# Altium PCB CLLC_SecondarSide_v1.PcbDoc
Units mm, origin at the board's own origin, x right, y up, seen from the top; angles counter-clockwise.
Board outline 131 x 138 mm, 2 copper layers (Top Layer, Bottom Layer); 17 components, 8 nets, 42 pads, 343 vias.
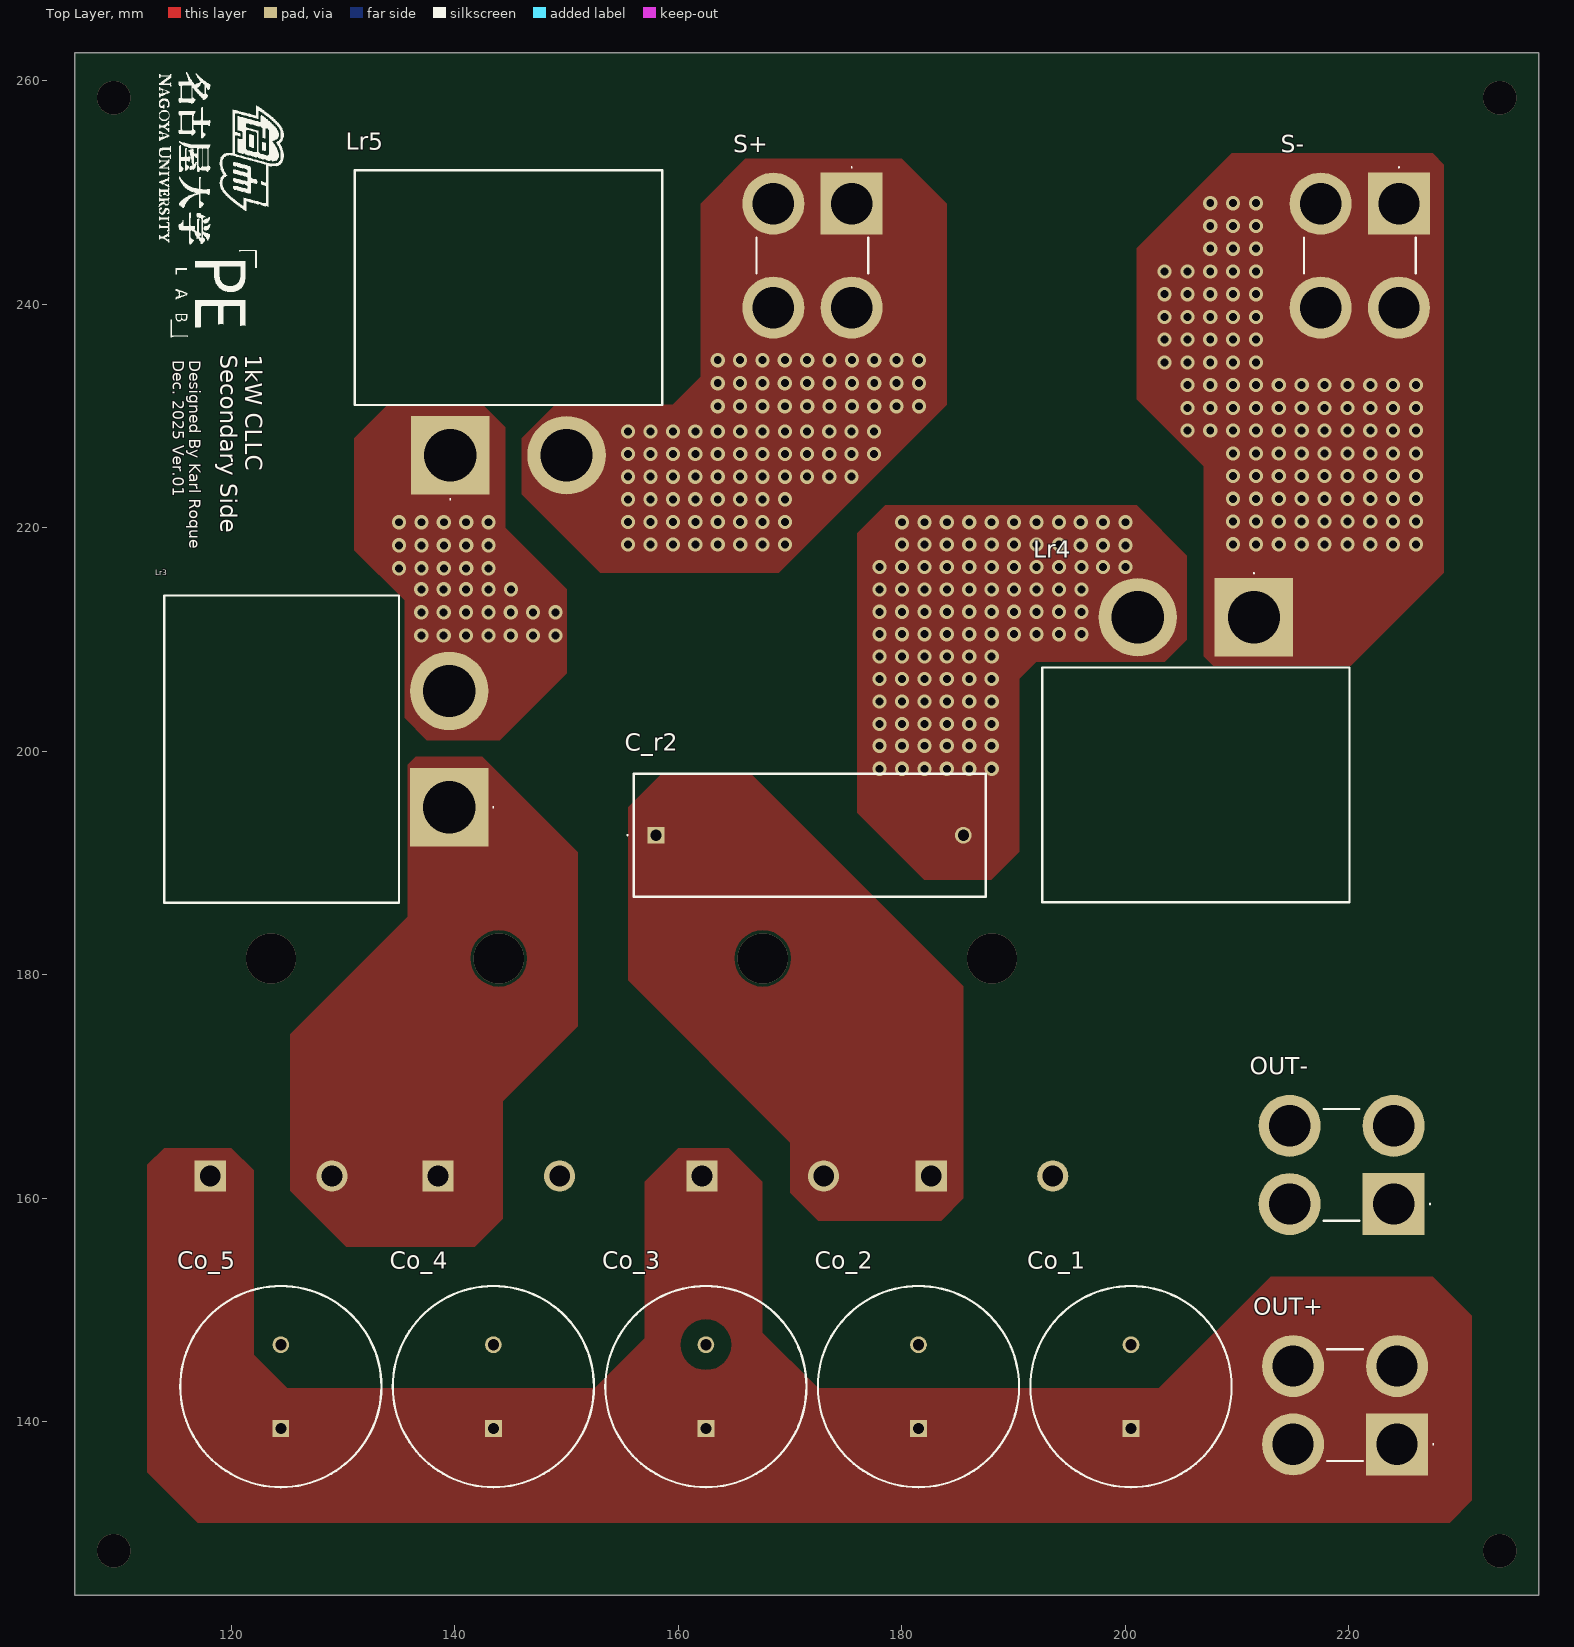
[diagram p0: Top Layer view]
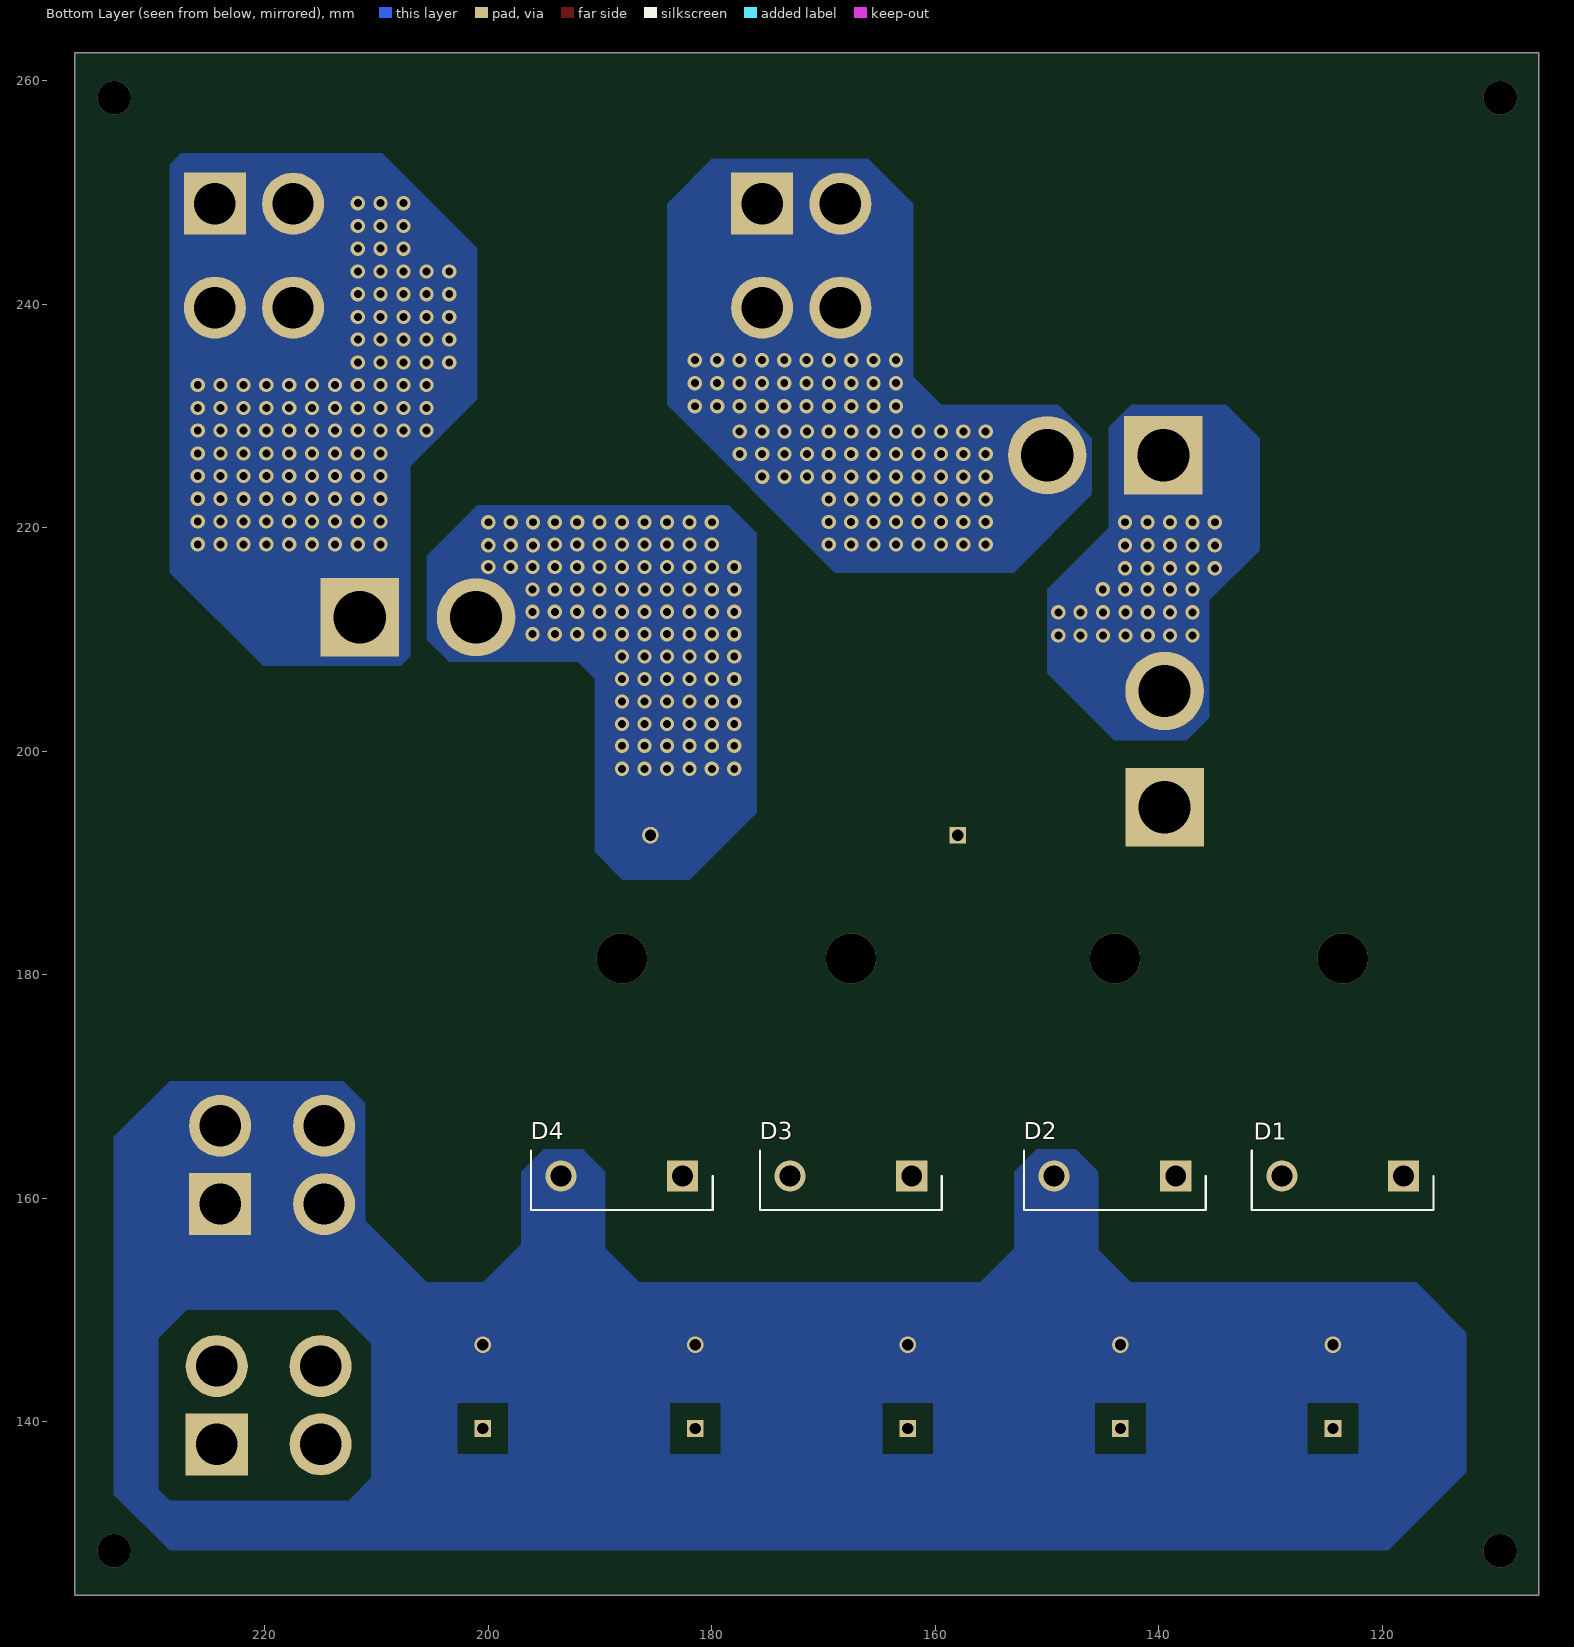
[diagram p1: Bottom Layer view, seen from below]
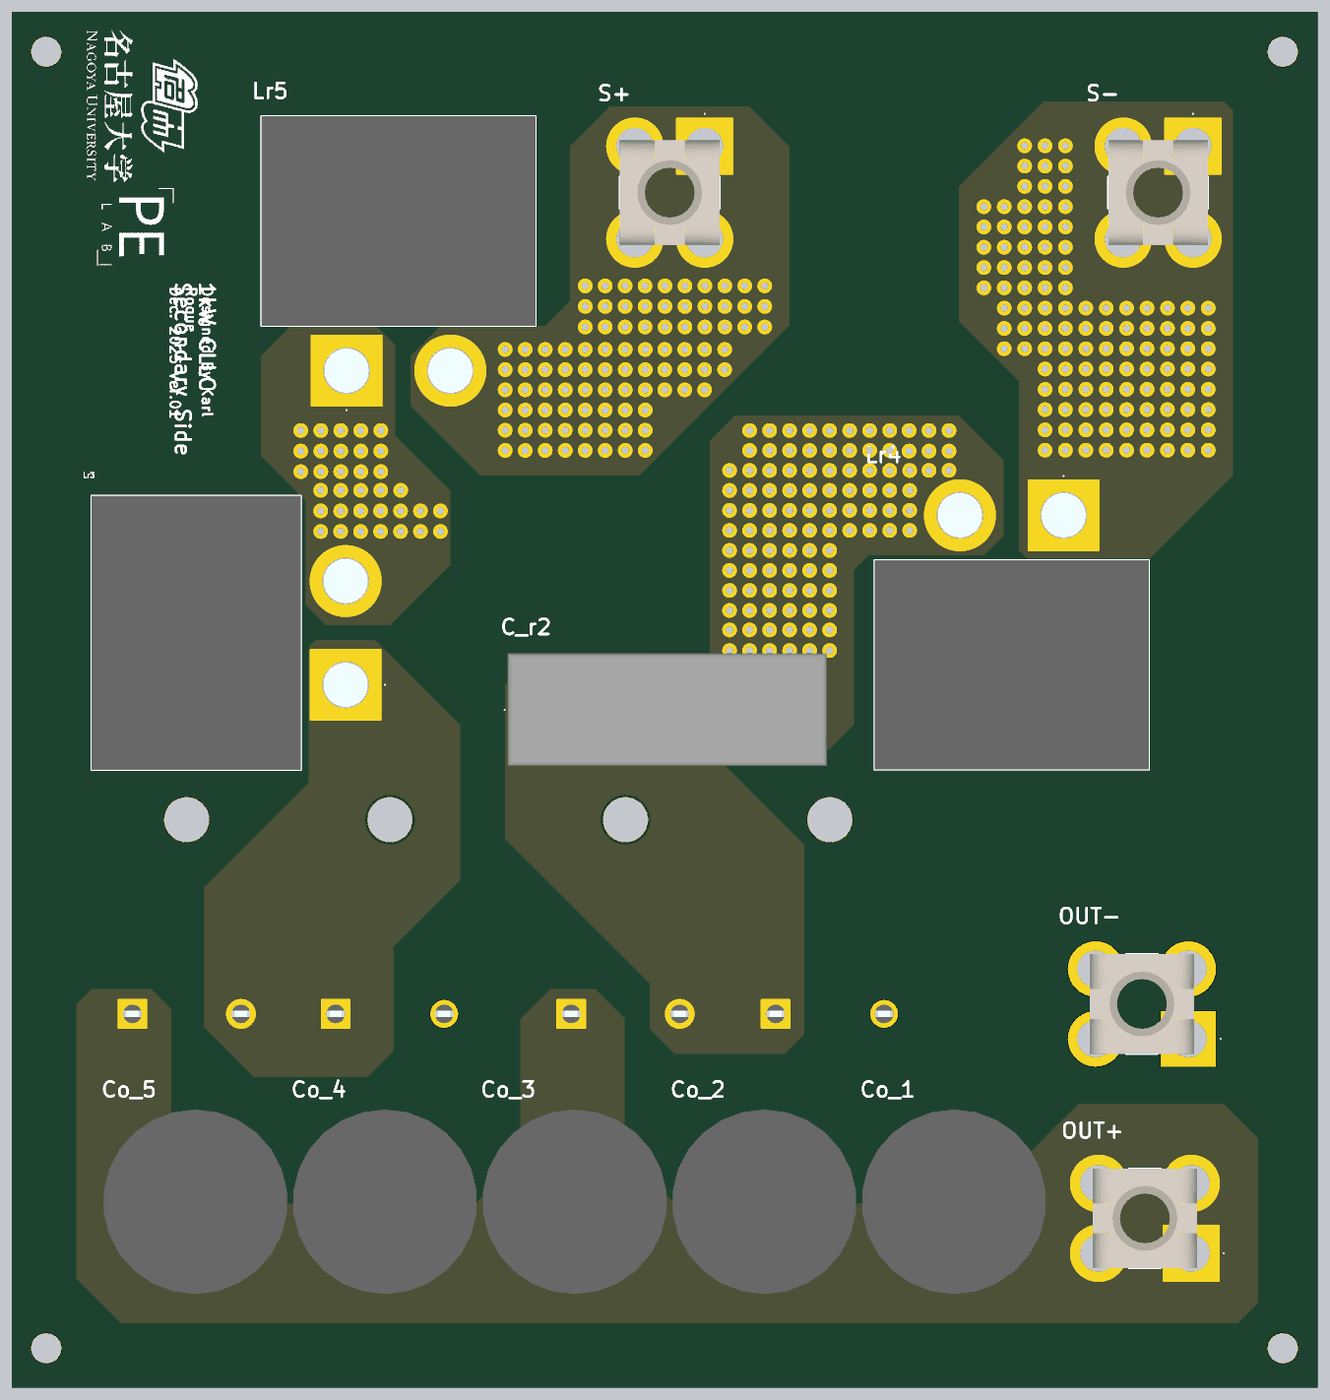
[diagram p2: 3D render of the assembled board from above, using the file's embedded part models]
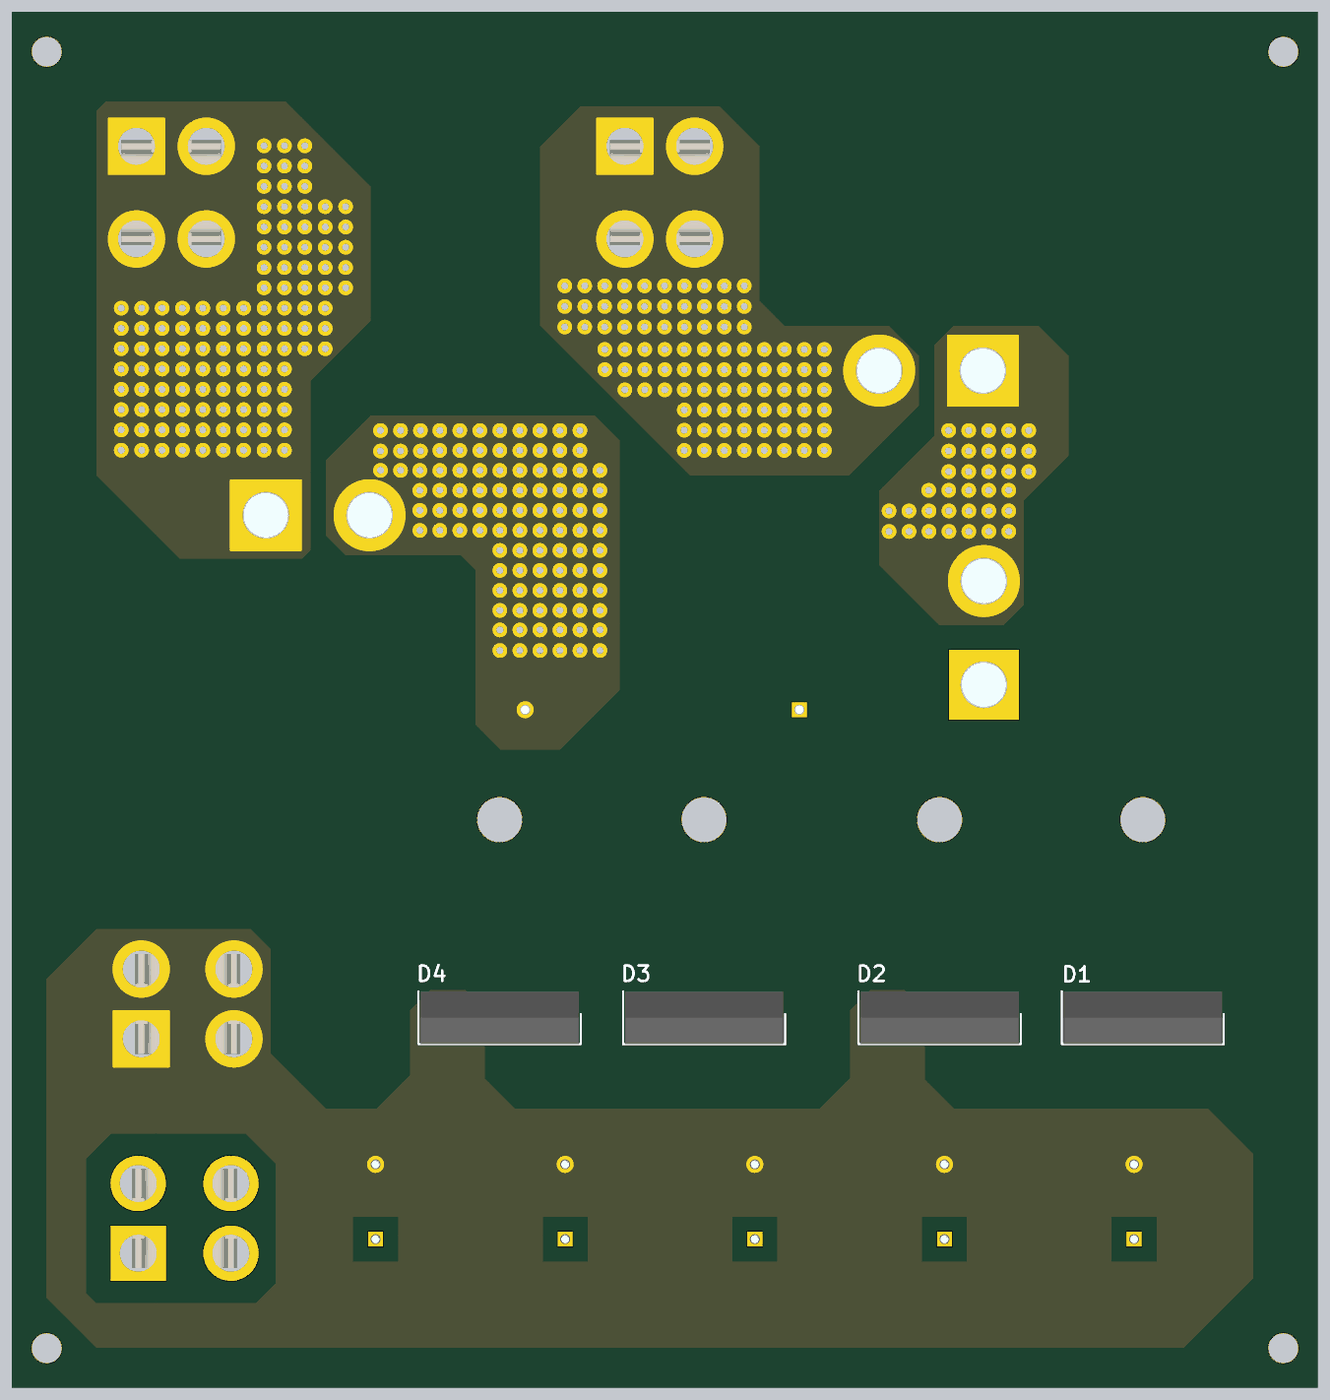
[diagram p3: 3D render of the assembled board from below, using the file's embedded part models]

## Layer stack, top to bottom
Top Solder: solder mask 0.0102, Solder Resist, Dk 3.5
Top Layer: signal copper 0.0356
Dielectric 1: dielectric 0.32, FR-4, Dk 4.8
Bottom Layer: signal copper 0.0356
Bottom Solder: solder mask 0.0102, Solder Resist, Dk 3.5

## Board outline
106,124.5 237,124.5 237,262.5 106,262.5

## Design rules (kind name [scope] priority, off if disabled: settings)
Clearance [InNet('GND') vs InNet('NetCo_1_1')] p1: gap=1.5 ignorepadtopadclearanceinfootprint=FALSE
Clearance Clearance_1 [All] p2: gap=0.254 ignorepadtopadclearanceinfootprint=FALSE
PolygonConnect PolygonConnect_4 [All vs IsNamedPolygon('NETC_R2_2_L01_P059') Or IsNamedPolygon('NETLR4_S1_L01_P060') Or IsNamedPolygon('NETLR5_F1_L01_P061') Or IsNamedPolygon('Top Layer-NetCo_1_1') Or IsNamedPolygon('Top Layer-NetC_r2_1') Or IsNamedPolygon('Top Layer-NetD1_2') Or IsNamedPolygon('Top Layer-NetD1_2 1') Or IsNamedPolygon('Top Layer-NetLr3_F1') Or IsNamedPolygon('Bottom Layer-GND') Or IsNamedPolygon('Bottom Layer-NetLr3_F1') Or IsNamedPolygon('NETC_R2_2_L02_P045') Or IsNamedPolygon('NETLR4_S1_L02_P057') Or IsNamedPolygon('NETLR5_F1_L02_P055')] p1: connectstyle=Direct reliefconductorwidth=0.254 reliefentries=4 polygonreliefangle="90 Angle" airgapwidth=0.254
PolygonConnect PolygonConnect_3 [All vs IsNamedPolygon('NETC_R2_1_L01_P015') Or IsNamedPolygon('NETC_R2_2_L01_P016') Or IsNamedPolygon('NETD1_2_L01_P011') Or IsNamedPolygon('NETLR3_F1_L01_P014') Or IsNamedPolygon('ETLR4_S1_L01_P018') Or IsNamedPolygon('NONET_L01_P023') Or IsNamedPolygon('Top Layer-NetCo_1_1') Or IsNamedPolygon('Bottom Layer-GND') Or IsNamedPolygon('NETC_R2_1_L02_P012') Or IsNamedPolygon('NETC_R2_2_L02_P033') Or IsNamedPolygon('NETD1_2_L02_P003') Or IsNamedPolygon('NETLR3_F1_L02_P004') Or IsNamedPolygon('NETLR4_S1_L02_P005')] p2: connectstyle=Direct reliefconductorwidth=0.254 reliefentries=4 polygonreliefangle="90 Angle" airgapwidth=0.254
PolygonConnect PolygonConnect_2 [All vs IsNamedPolygon('NETC_R2_1_L01_P015') Or IsNamedPolygon('NETC_R2_2_L01_P006') Or IsNamedPolygon('NETC_R2_2_L01_P019') Or IsNamedPolygon('NETD1_2_L01_P011') Or IsNamedPolygon('NETLR3_F1_L01_P014') Or IsNamedPolygon('ETLR4_S1_L01_P018') Or IsNamedPolygon('NONET_L01_P023') Or IsNamedPolygon('Top Layer-NetCo_1_1') Or IsNamedPolygon('Bottom Layer-GND') Or IsNamedPolygon('NETC_R2_1_L02_P012') Or IsNamedPolygon('NETC_R2_2_L01_P016') Or IsNamedPolygon('NETD1_2_L02_P003') Or IsNamedPolygon('NETLR3_F1_L02_P004') Or IsNamedPolygon('NETLR4_S1_L02_P005')] p3: connectstyle=Direct reliefconductorwidth=0.254 reliefentries=4 polygonreliefangle="90 Angle" airgapwidth=0.254
PolygonConnect PolygonConnect_1 [All vs IsNamedPolygon('NETC_R2_1_L01_P015') Or IsNamedPolygon('NETC_R2_2_L01_P006') Or IsNamedPolygon('NETC_R2_2_L01_P019') Or IsNamedPolygon('NETD1_2_L01_P011') Or IsNamedPolygon('NETLR3_F1_L01_P014') Or IsNamedPolygon('ETLR4_S1_L01_P018') Or IsNamedPolygon('Top Layer-NetCo_1_1') Or IsNamedPolygon('GND_L02_P008') Or IsNamedPolygon('NETC_R2_1_L02_P012') Or IsNamedPolygon('NETC_R2_2_L01_P016') Or IsNamedPolygon('NETD1_2_L02_P003') Or IsNamedPolygon('NETLR3_F1_L02_P004') Or IsNamedPolygon('NETLR4_S1_L02_P005')] p4: connectstyle=Direct reliefconductorwidth=0.254 reliefentries=4 polygonreliefangle="90 Angle" airgapwidth=0.254
PolygonConnect [All] p5: connectstyle=Relief reliefconductorwidth=0.254 reliefentries=4 polygonreliefangle="90 Angle" airgapwidth=0.254
RoutingVias [All] p1: holewidth=0.711 width=1.27 viastyle="Through Hole" minholewidth=0.711 minwidth=1.27 maxholewidth=0.711 maxwidth=1.27
SolderMaskExpansion [All] p1: expansion=0.102 istentingtop=FALSE
SupplyNets "Schematic Supply Nets" [InNet('GND')] p1: voltage=0.000
Width [All] p1: maxlimit=0.254 minlimit=0.254 preferedwidth=0.254
30 further rules are at their usual default settings.

## Components (designator, comment, footprint, x,y, rotation, side; value= is the part's Value field where it differs from the comment)
C_r2 "C4AQQBU4140M1WJ" C4AQQBU4140M1WJ 158,192.5 r0 top
Co_1 "UCP2G221MHD" CAPPRD750W80D1800H4800 200.5,139.412 r90 top
Co_2 "UCP2G221MHD" CAPPRD750W80D1800H4800 181.484,139.412 r90 top
Co_3 "UCP2G221MHD" CAPPRD750W80D1800H4800 162.468,139.412 r90 top
Co_4 "UCP2G221MHD" CAPPRD750W80D1800H4800 143.452,139.412 r90 top
Co_5 "UCP2G221MHD" CAPPRD750W80D1800H4800 124.436,139.412 r90 top
D1 "STTH3012WL" TO1088P531X1588X2596-2P 118.12,162 r0 bottom
D2 "STTH3012WL" TO1088P531X1588X2596-2P 138.5,162 r0 bottom
D3 "STTH3012WL" TO1088P531X1588X2596-2P 162.12,162 r0 bottom
D4 "STTH3012WL" TO1088P531X1588X2596-2P 182.62,162 r0 bottom
Lr3 "ER26A2DC-6R8K" ER26A2DC6R8K 139.5,195 r90 top
Lr4 "ER26A2DC-6R8K" ER26A2DC6R8K 211.5,212 r180 top
Lr5 "ER26A2DC-6R8K" ER26A2DC6R8K 139.6,226.5 r0 top
OUT+ "AMT0450028DB0000G" AMT0450028DB0000G 224.3,138 r90 top
OUT- "AMT0450028DB0000G" AMT0450028DB0000G 224,159.5 r90 top
S+ "AMT0450028DB0000G" AMT0450028DB0000G 175.5,249 r180 top
S- "AMT0450028DB0000G" AMT0450028DB0000G 224.473,249 r180 top

## Footprints (in the part's own frame and the unit in brackets; to place one, negate y for a bottom-side part, rotate by r counter-clockwise, add the part's x,y. Pads: shape width x height; smd on the part's side, far side on the other; paste and mask are expansions set on the pad)
AMT0450028DB0000G [mm]
  rect 5.55x5.55 hole 3.7: 1(0,0)
  round 5.55 hole 3.7: 2(0,9.3) 3(7,0) 4(7,9.3)
  silkscreen extent -1.5,-3.3 8.5,6.25, body extent -1.5,-0.6 8.5,9.9, height 7.59
C4AQQBU4140M1WJ [mm]
  rect 1.5x1.5 hole 1: 1(0,0)
  round 1.5 hole 1: 2(27.5,0)
  silkscreen extent -2.6,-5.5 29.5,5.5, body extent -2.25,-5.66 29.75,5.65, height 20.16
CAPPRD750W80D1800H4800 [mm]
  rect 1.5x1.5 hole 1: 1(0,0)
  round 1.5 hole 1: 2(7.5,0)
  silkscreen extent -5.25,-9 12.75,9, body extent -5.5,-9.25 13,9.25, height 48
ER26A2DC6R8K [mm]
  round 7.02 hole 4.68: F1(10.4,0)
  rect 7.02x7.02 hole 4.68: S1(0,0)
  silkscreen extent -8.55,-4 18.95,25.5, body extent -8.55,-2.23 18.95,25.5, height 17.1
TO1088P531X1588X2596-2P [mm]
  rect 2.79x2.79 hole 1.86: 1(0,0)
  round 2.79 hole 1.86: 2(10.88,0)
  silkscreen extent -2.69,-2.27 13.57,3.04, body extent -2.5,-2.27 13.38,3.04, height 25.96

## Part data
C_r2: "Capacitor", Manufacturer_Name=KEMET, Mouser Part Number=80-C4AQQBU4140M1WJ, Datasheet Link=https://search.kemet.com/component-documentation/download/specsheet/C4AQQBU4140M1WJ, Height=20.2mm, Manufacturer_Part_Number=C4AQQBU4140M1WJ, Mouser Price/Stock=https://www.mouser.co.uk/ProductDetail/KEMET/C4AQQBU4140M1WJ?qs=81r%252BiQLm7BSMlBltxrghzA%3D%3D
Co_1 Co_2 Co_3 Co_4 Co_5: "Capacitor", Manufacturer_Name=Nichicon, Mouser Part Number=647-UCP2G221MHD, Datasheet Link=https://componentsearchengine.com/Datasheets/1/UCP2G221MHD.pdf, Height=48mm, Manufacturer_Part_Number=UCP2G221MHD, Mouser Price/Stock=https://www.mouser.co.uk/ProductDetail/Nichicon/UCP2G221MHD?qs=iCzJi%2FIZBF51iuUvn3RRMQ%3D%3D
D1 D2 D3 D4: "Diode", Manufacturer_Name=STMicroelectronics, Mouser Part Number=511-STTH3012WL, Arrow Part Number=STTH3012WL, Arrow Price/Stock=https://www.arrow.com/en/products/stth3012wl/stmicroelectronics?region=nac, Datasheet Link=https://www.st.com/resource/en/datasheet/stth3012.pdf, Height=5.31mm, Manufacturer_Part_Number=STTH3012WL, Mouser Price/Stock=https://www.mouser.co.uk/ProductDetail/STMicroelectronics/STTH3012WL?qs=tlsG%2FOw5FFj6CHRXwq6hOA%3D%3D
Lr3 Lr4 Lr5: "Inductor", Manufacturer_Name=Bourns, Datasheet Link=https://www.bourns.com/docs/product-datasheets/er26a.pdf, Height=17mm, Manufacturer_Part_Number=ER26A2DC-6R8K
OUT+ OUT- S+ S-: "Connector", Manufacturer_Name=Amphenol, Mouser Part Number=523-AMT0450028DB000G, Datasheet Link=https://www.anytek.com.cn/Upload/AMT45028DB-821f25108d7e4e0caa268ff3448ada5b.pdf, Height=7.4mm, Manufacturer_Part_Number=AMT0450028DB0000G, Mouser Price/Stock=https://www.mouser.co.uk/ProductDetail/Amphenol-Anytek/AMT0450028DB0000G?qs=ST9lo4GX8V0in%252BhOLfQ9xA%3D%3D

## Via types
v1: diameter 1.27, hole 0.711, Top Layer to Bottom Layer, 335 vias
v2: diameter 4.5, hole 4.5, Top Layer to Bottom Layer, 4 vias
v3: diameter 3, hole 3, Top Layer to Bottom Layer, 4 vias

## Nets (pads, with @x,y where several pads share a name; then routed paths per layer and width w, separated by ;. In a path a pad name is that pad's centre, name@x,y a point inside that pad or via, vN(x,y) a via of type N, cw(c..) or ccw(c..) an arc to the next point about the centre after c; other vN are vias at no path point)
GND: Co_1.2 Co_2.2 Co_3.2 Co_4.2 Co_5.2 D2.2 D4.2 OUT-.1 OUT-.2 OUT-.3 OUT-.4
NetC_r2_1: C_r2.1 D3.2 D4.1
NetC_r2_2: C_r2.2 Lr4.F1
  other v1: 178,198.438 180.006,198.438 182.013,198.438 184.019,198.438 186.026,198.438 188.032,198.438 178,200.5 180.006,200.5 182.013,200.5 184.019,200.5 186.026,200.5 188.032,200.5 178,202.455 180.007,202.455 182.014,202.455 184.021,202.455 186.028,202.455 188.035,202.455 178,204.461 180.007,204.461 182.014,204.461 184.021,204.461 186.028,204.461 188.035,204.461 178,206.468 180.007,206.468 182.014,206.468 184.021,206.468 186.028,206.468 188.035,206.468 178,208.474 180.007,208.474 182.014,208.474 184.021,208.474 186.028,208.474 188.035,208.474 178,210.481 180.007,210.481 182.014,210.481 184.021,210.481 186.028,210.481 188.035,210.481 190.042,210.481 192.049,210.481 194.056,210.481 196.062,210.481 178,212.487 180.007,212.487 182.014,212.487 184.021,212.487 186.028,212.487 188.035,212.487 190.042,212.487 192.049,212.487 194.056,212.487 196.062,212.487 178,214.49 180.007,214.49 182.014,214.49 184.021,214.49 186.028,214.49 188.035,214.49 190.042,214.49 192.049,214.49 194.056,214.49 196.062,214.49 178,216.494 180.007,216.494 182.014,216.494 184.021,216.494 186.028,216.494 188.035,216.494 190.042,216.494 192.049,216.494 194.056,216.494 196.062,216.494 198,216.5 200.006,216.5 196,218.438 198,218.438 200.006,218.438 180.007,218.497 182.014,218.497 184.021,218.497 186.028,218.497 188.035,218.497 190.042,218.497 192.049,218.497 194.056,218.497 180.007,220.5 182.014,220.5 184.021,220.5 186.028,220.5 188.035,220.5 190.042,220.5 192.049,220.5 194.056,220.5 196,220.5 198,220.5 200.006,220.5
NetCo_1_1: Co_1.1 Co_2.1 Co_3.1 Co_4.1 Co_5.1 D1.1 D3.1 OUT+.1 OUT+.2 OUT+.3 OUT+.4
NetD1_2: D1.2 D2.1 Lr3.S1
NetLr3_F1: Lr3.F1 Lr5.S1
  other v1: 137,210.375 139.001,210.375 141.002,210.375 143.003,210.375 145.004,210.375 147.005,210.375 149.006,210.375 137,212.438 139.001,212.438 141.002,212.438 143.003,212.438 145.004,212.438 147.005,212.438 149.006,212.438 137,214.5 139.006,214.5 141.013,214.5 143.019,214.5 145.026,214.5 135,216.375 137.006,216.375 139.013,216.375 141.019,216.375 143.026,216.375 135,218.438 137.006,218.438 139.013,218.438 141.019,218.438 143.026,218.438 135,220.5 137.006,220.5 139.013,220.5 141.019,220.5 143.026,220.5
NetLr4_S1: Lr4.S1 S-.1 S-.2 S-.3 S-.4
  other v1: 209.636,218.523 211.682,218.523 213.727,218.523 215.773,218.523 217.818,218.523 219.864,218.523 221.909,218.523 223.955,218.523 226,218.523 209.636,220.558 211.682,220.558 213.727,220.558 215.773,220.558 217.818,220.558 219.864,220.558 221.909,220.558 223.955,220.558 226,220.558 209.636,222.592 211.682,222.592 213.727,222.592 215.773,222.592 217.818,222.592 219.864,222.592 221.909,222.592 223.955,222.592 226,222.592 209.636,224.627 211.682,224.627 213.727,224.627 215.773,224.627 217.818,224.627 219.864,224.627 221.909,224.627 223.955,224.627 226,224.627 209.636,226.662 211.682,226.662 213.727,226.662 215.773,226.662 217.818,226.662 219.864,226.662 221.909,226.662 223.955,226.662 226,226.662 205.545,228.697 207.591,228.697 209.636,228.697 211.682,228.697 213.727,228.697 215.773,228.697 217.818,228.697 219.864,228.697 221.909,228.697 223.955,228.697 226,228.697 205.545,230.732 207.591,230.732 209.636,230.732 211.682,230.732 213.727,230.732 215.773,230.732 217.818,230.732 219.864,230.732 221.909,230.732 223.955,230.732 226,230.732 205.545,232.767 207.591,232.767 209.636,232.767 211.682,232.767 213.727,232.767 215.773,232.767 217.818,232.767 219.864,232.767 221.909,232.767 223.955,232.767 226,232.767 203.5,234.802 205.545,234.802 207.591,234.802 209.636,234.802 211.682,234.802 203.5,236.836 205.545,236.836 207.591,236.836 209.636,236.836 211.682,236.836 203.5,238.871 205.545,238.871 207.591,238.871 209.636,238.871 211.682,238.871 203.5,240.906 205.545,240.906 207.591,240.906 209.636,240.906 211.682,240.906 203.5,242.941 205.545,242.941 207.591,242.941 209.636,242.941 211.682,242.941 207.591,244.976 209.636,244.976 211.682,244.976 207.591,247.011 209.636,247.011 211.682,247.011 207.591,249.045 209.636,249.045 211.682,249.045
NetLr5_F1: Lr5.F1 S+.1 S+.2 S+.3 S+.4
  other v1: 155.5,218.5 157.506,218.5 159.513,218.5 161.519,218.5 163.526,218.5 165.532,218.5 167.539,218.5 169.545,218.5 155.5,220.525 157.506,220.525 159.513,220.525 161.519,220.525 163.526,220.525 165.532,220.525 167.539,220.525 169.545,220.525 155.5,222.55 157.506,222.55 159.513,222.55 161.519,222.55 163.526,222.55 165.532,222.55 167.539,222.55 169.545,222.55 155.5,224.575 157.506,224.575 159.513,224.575 161.519,224.575 163.526,224.575 165.532,224.575 167.539,224.575 169.545,224.575 171.5,224.575 173.506,224.575 175.5,224.575 155.5,226.6 157.506,226.6 159.513,226.6 161.519,226.6 163.526,226.6 165.532,226.6 167.539,226.6 169.545,226.6 171.5,226.6 173.506,226.6 175.5,226.6 177.506,226.6 155.5,228.625 157.506,228.625 159.513,228.625 161.519,228.625 163.526,228.625 165.532,228.625 167.539,228.625 169.545,228.625 171.5,228.625 173.506,228.625 175.5,228.625 177.513,228.625 163.526,230.875 165.526,230.875 167.526,230.875 169.526,230.875 171.526,230.875 173.526,230.875 175.526,230.875 177.526,230.875 179.526,230.875 181.526,230.875 163.526,232.938 165.526,232.938 167.526,232.938 169.526,232.938 171.526,232.938 173.526,232.938 175.526,232.938 177.526,232.938 179.526,232.938 181.526,232.938 163.526,235 165.526,235 167.526,235 169.526,235 171.526,235 173.526,235 175.526,235 177.526,235 179.526,235 181.526,235
copper on no net:
  other v2: 123.56,181.47 143.94,181.47 167.56,181.47 188.06,181.47
  other v3: 109.475,128.475 233.475,128.475 109.475,258.475 233.475,258.475

## Polygon pours and split planes (outlines as drawn)
NetLr4_S1 on Top Layer "NETLR4_S1_L01_P060" (solid, pour order 60): 207,208.5 207.85,207.65 220.15,207.65 228.5,216 228.5,252.5 227.5,253.5 209.5,253.5 201,245 201,231.5 207,225.5
NetD1_2 on Top Layer "Top Layer-NetD1_2 1" (solid, pour order 53): 125.281,160.689 130.281,155.689 141.781,155.689 144.281,158.189 144.281,168.689 151,175.408 151,190.97 144.281,197.689 142.47,199.5 136.5,199.5 135.781,198.781 135.781,185.189 125.281,174.689
NetC_r2_1 on Top Layer "Top Layer-NetC_r2_1" (solid, pour order 48): 170,160.5 172.5,158 183.5,158 185.5,160 185.5,164 185.5,179 166.5,198 158.5,198 155.5,195 155.5,179.5 170,165
NetCo_1_1 on Top Layer "Top Layer-NetCo_1_1" (solid, pour order 52): 112.5,163 112.5,135.5 117,131 229,131 231,133 231,149.5 227.5,153 213,153 203,143 172.5,143 167.5,148 167.5,161.5 164.5,164.5 160,164.5 157,161.5 157,147.5 152.5,143 125,143 122,146 122,162.5 120,164.5 114,164.5
NetC_r2_2 on Top Layer "NETC_R2_2_L01_P059" (solid, pour order 59): 188,188.5 190.5,191 190.5,206.5 192,208 203.5,208 205.5,210 205.5,217.5 201,222 178.5,222 176,219.5 176,194.5 182,188.5
NetLr5_F1 on Top Layer "NETLR5_F1_L01_P061" (solid, pour order 61): 149,231 159.5,231 162,233.5 162,249 166,253 180,253 184,249 184,231 169,216 153,216 146,223 146,228
NetLr3_F1 on Top Layer "Top Layer-NetLr3_F1" (solid, pour order 62): 135.5,203 137.5,201 144,201 150,207 150,214.5 144.5,220 144.5,229 142.5,231 134,231 131,228 131,218 135.5,213.5
GND on Bottom Layer "Bottom Layer-GND" (solid, pour order 51): 112.5,135.5 119.5,128.5 228.5,128.5 233.5,133.5 233.5,165.5 228.5,170.5 213,170.5 211,168.5 211,158 205.5,152.5 200.451,152.5 197.056,155.895 197.056,162.395 195.056,164.395 191.556,164.395 189.556,162.395 189.556,155.556 186.5,152.5 156,152.5 152.936,155.564 152.936,162.395 150.936,164.395 147.436,164.395 145.436,162.395 145.436,155.395 142.541,152.5 117,152.5 112.5,148
NetC_r2_2 on Bottom Layer "NETC_R2_2_L02_P045" (solid, pour order 45): 188,188.5 190.5,191 190.5,206.5 192,208 203.5,208 205.5,210 205.5,217.5 201,222 178.5,222 176,219.5 176,194.5 182,188.5
NetLr5_F1 on Bottom Layer "NETLR5_F1_L02_P055" (solid, pour order 55): 149,231 159.5,231 162,233.5 162,249 166,253 180,253 184,249 184,231 169,216 153,216 146,223 146,228
NetLr3_F1 on Bottom Layer "Bottom Layer-NetLr3_F1" (solid, pour order 56): 135.5,203 137.5,201 144,201 150,207 150,214.5 144.5,220 144.5,229 142.5,231 134,231 131,228 131,218 135.5,213.5
NetLr4_S1 on Bottom Layer "NETLR4_S1_L02_P057" (solid, pour order 57): 207,208.5 207.85,207.65 220.15,207.65 228.5,216 228.5,252.5 227.5,253.5 209.5,253.5 201,245 201,231.5 207,225.5

## Other copper
Bottom Layer:
  pour cut-out: 213.5,150 210.5,147 210.5,135 212.5,133 228.5,133 229.5,134 229.5,147.5 227,150

## Silkscreen, mask and mechanical layers (free items; w line width, h text height)
Top Overlay:
  drawing of 38 lines, arcs and shapes, not listed
  text "1kW CLLC / Secondary Side" at 119,235.5 h1.5 r270
  text "Designed By Karl Roque / Dec. 2025 Ver.01" at 114.759,234.994 h1 r270